# Altium PCB ide_podule-16bit_long.PcbDoc (part 2 of 2)
Units mm, origin at the board's own origin, x right, y up, seen from the top; angles counter-clockwise.
Board outline 101.85 x 160.01 mm, 2 copper layers (F.Cu, B.Cu), stack 1.571 mm thick; 35 components, 85 nets, 455 pads, 316 vias.
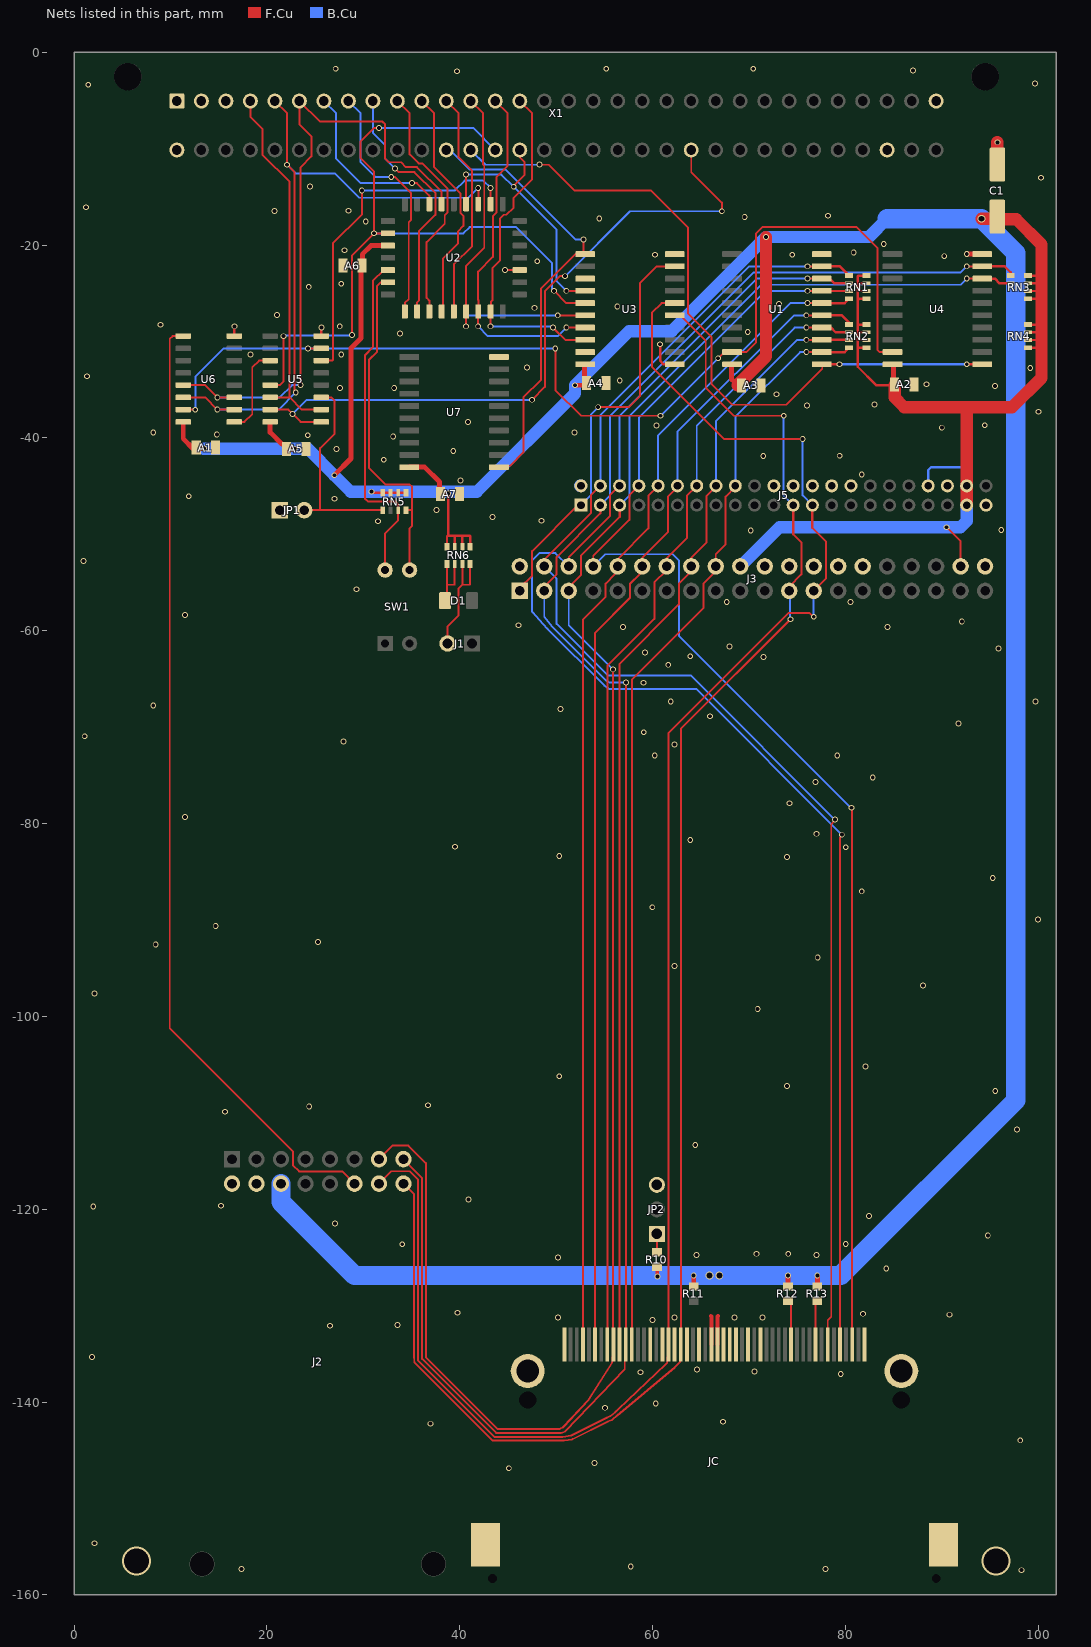
[diagram p2: the nets of this part, all layers, seen from the top]

## Via types
v1: diameter 0.6, hole 0.4, F.Cu to B.Cu, tented both sides, 311 vias
v2: diameter 0.8, hole 0.6, F.Cu to B.Cu, tented both sides, 3 vias
v3: diameter 3, hole 2.6, F.Cu to B.Cu, tented both sides, 2 vias

## Nets (pads, with @x,y where several pads share a name; then routed paths per layer and width w, separated by ;. In a path a pad name is that pad's centre, name@x,y a point inside that pad or via, vN(x,y) a via of type N, cw(c..) or ccw(c..) an arc to the next point about the centre after c; other vN are vias at no path point) (continued)
D6: J2.13 J3.5 J5.5 JC.5 RN3.2 U4.8 | length 200.5
  F.Cu w0.2: J2.13@31.623,-114.808 33.02,-113.411 34.671,-113.411 36.487,-115.227 36.487,-135.365 43.927,-142.805 50.344,-142.805 50.702,-142.622 50.705,-142.619 50.763,-142.561 53.331,-139.818 55.806,-135.903 55.841,-135.679 JC.5@55.941,-134.029 55.911,-133.999 55.911,-64.013 v1(55.906,-64.008) ; J3.5@51.308,-55.868 51.308,-55.487 52.578,-54.217 52.578,-52.185 56.578,-48.185 ; v1(92.583,-23.483) U4.8@94.235,-23.483
  F.Cu w0.254: 56.578,-48.185 J5.5@56.578,-46.978 ; U4.8@94.235,-23.483 95.504,-23.483 95.993,-23.972 RN3.2@97.144,-23.972
  B.Cu w0.2: J3.5@51.308,-55.868 51.308,-59.436 55.88,-64.008 v1(55.906,-64.008) ; J5.5@56.578,-46.978 56.642,-46.978 57.594,-46.026 57.594,-37.771 71.247,-24.118 91.948,-24.118 v1(92.583,-23.483)
D7: J2.15 J3.3 J5.3 JC.6 RN3.1 U4.9 | length 203.3
  F.Cu w0.2: J2.15@34.163,-114.808 34.163,-114.84 36.087,-116.764 36.087,-135.531 43.761,-143.205 50.51,-143.205 50.896,-143.076 50.956,-143.016 57.111,-136.584 57.111,-134.129 JC.6@57.211,-134.029 57.244,-133.996 57.244,-65.388 v1(57.246,-65.386) ; J3.3@48.768,-55.868 48.768,-55.424 50.038,-54.154 50.038,-52.376 54.578,-47.836 J5.3@54.578,-46.978 ; v1(92.583,-22.213) U4.9@94.235,-22.213
  F.Cu w0.254: U4.9@94.235,-22.213 96.52,-22.213 97.144,-22.837 RN3.1@97.144,-23.172
  B.Cu w0.2: J3.3@48.768,-55.868 48.768,-58.562 49.596,-59.571 55.195,-65.17 55.548,-65.362 55.592,-65.386 55.643,-65.386 v1(57.246,-65.386) ; J5.3@54.578,-46.978 54.61,-46.978 55.562,-46.026 55.562,-37.771 70.485,-22.848 91.948,-22.848 v1(92.583,-22.213)
D8: J3.4 J5.4 JC.47 RN1.1 U1.9 | length 149.2
  F.Cu w0.2: J3.4@48.768,-53.328 48.768,-52.63 53.594,-47.804 53.594,-45.962 J5.4@54.578,-44.978 ; v1(76.073,-22.213) U1.9@77.598,-22.213 ; JC.47@78.166,-134.029 78.166,-131.526 78.528,-131.164 78.528,-80.052 78.91,-79.67 v1(78.91,-79.586)
  F.Cu w0.254: U1.9@77.598,-22.213 79.421,-22.213 RN1.1@80.38,-23.172
  B.Cu w0.2: J3.4@48.768,-53.328 50.038,-54.598 50.038,-56.273 50.038,-59.295 55.405,-64.662 63.987,-64.662 v1(78.91,-79.586) ; J5.4@54.578,-44.978 54.578,-37.675 70.04,-22.213 v1(76.073,-22.213)
D9: J3.6 J5.6 JC.48 RN1.2 U1.8 | length 152.4
  F.Cu w0.2: J3.6@51.308,-53.328 51.308,-52.376 55.562,-48.121 55.562,-45.962 56.547,-44.978 J5.6@56.578,-44.978 ; v1(76.073,-23.483) U1.8@77.598,-23.483 ; JC.48@79.436,-134.029 79.436,-81.454 79.629,-81.261 v1(79.629,-81.153)
  F.Cu w0.254: U1.8@77.598,-23.483 78.359,-23.483 78.848,-23.972 RN1.2@80.38,-23.972
  B.Cu w0.2: J3.6@51.308,-53.328 49.923,-51.943 48.26,-51.943 47.498,-52.705 47.498,-58.032 47.563,-58.104 48.26,-58.877 49.088,-59.782 54.984,-65.678 55.277,-65.894 55.499,-66.04 64.516,-66.04 v1(79.629,-81.153) ; J5.6@56.578,-44.978 56.578,-37.708 70.802,-23.483 v1(76.073,-23.483)
D10: J3.8 J5.8 JC.49 RN1.3 U1.7 | length 143.1
  F.Cu w0.2: J3.8@53.848,-53.328 53.848,-52.249 57.594,-48.502 57.594,-45.962 J5.8@58.578,-44.978 ; v1(76.073,-24.753) U1.7@77.548,-24.753 80.361,-24.753 RN1.3@80.38,-24.772 ; v1(80.645,-78.359) 80.676,-78.39 80.676,-133.999 JC.49@80.706,-134.029
  B.Cu w0.2: J3.8@53.848,-53.328 55.106,-52.07 62.103,-52.07 62.738,-52.705 62.738,-60.539 80.558,-78.359 v1(80.645,-78.359) ; J5.8@58.578,-44.978 58.578,-37.93 71.755,-24.753 v1(76.073,-24.753)
D11: J3.10 J5.10 JC.27 RN1.4 U1.6 | length 123.2
  F.Cu w0.2: JC.27@52.766,-134.029 52.766,-58.848 55.118,-56.496 55.118,-55.118 56.101,-54.135 56.101,-53.615 J3.10@56.388,-53.328 56.388,-52.566 59.563,-49.391 59.563,-46.026 60.578,-45.011 J5.10@60.578,-44.978 ; v1(76.073,-26.023) U1.6@77.598,-26.023
  F.Cu w0.254: U1.6@77.598,-26.023 79.929,-26.023 RN1.4@80.38,-25.572
  B.Cu w0.2: J5.10@60.578,-44.978 60.578,-39.74 74.295,-26.023 v1(76.073,-26.023)
D12: J3.12 J5.12 JC.28 RN2.1 U1.5 | length 121.5
  F.Cu w0.2: JC.28@54.036,-134.029 54.036,-60.228 57.658,-56.606 57.658,-55.118 58.651,-54.125 58.651,-53.605 J3.12@58.928,-53.328 58.928,-52.439 61.595,-49.772 61.595,-46.089 62.578,-45.106 J5.12@62.578,-44.978 ; v1(75.946,-27.293) U1.5@77.598,-27.293
  F.Cu w0.254: U1.5@77.598,-27.293 79.629,-27.293 80.38,-28.044 RN2.1@80.38,-28.252
  B.Cu w0.2: J5.12@62.578,-44.978 62.578,-39.391 74.676,-27.293 v1(75.946,-27.293)
D13: J3.14 J5.14 JC.29 RN2.2 U1.4 | length 119.4
  F.Cu w0.2: JC.29@55.306,-134.029 55.306,-63.657 60.198,-58.765 60.198,-54.991 61.468,-53.721 61.468,-52.503 63.563,-50.407 63.563,-46.026 64.578,-45.011 J5.14@64.578,-44.978 ; v1(75.946,-28.563) U1.4@77.598,-28.563
  F.Cu w0.254: U1.4@77.598,-28.563 78.486,-28.563 78.975,-29.052 RN2.2@80.38,-29.052
  B.Cu w0.2: J5.14@64.578,-44.978 64.578,-38.725 74.739,-28.563 v1(75.946,-28.563)
D14: J3.16 J5.16 JC.30 RN2.3 U1.3 | length 117.2
  F.Cu w0.2: JC.30@56.576,-134.029 56.576,-63.439 62.738,-57.277 62.738,-55.118 63.721,-54.135 63.721,-53.615 J3.16@64.008,-53.328 64.008,-52.439 65.596,-50.852 65.596,-46.026 66.578,-45.043 J5.16@66.578,-44.978 ; v1(75.946,-29.833) U1.3@77.598,-29.833
  F.Cu w0.254: U1.3@77.598,-29.833 80.361,-29.833 RN2.3@80.38,-29.852
  B.Cu w0.2: J5.16@66.578,-44.978 66.578,-38.249 74.993,-29.833 v1(75.946,-29.833)
D15: J3.18 J5.18 JC.31 RN2.4 U1.2 | length 115.4
  F.Cu w0.2: JC.31@57.846,-134.029 57.846,-65.09 65.278,-57.658 65.278,-55.118 66.261,-54.135 66.261,-53.615 J3.18@66.548,-53.328 66.548,-52.058 67.564,-51.042 67.564,-46.089 68.578,-45.075 J5.18@68.578,-44.978 ; v1(75.946,-31.103) U1.2@77.598,-31.103
  F.Cu w0.254: U1.2@77.598,-31.103 79.929,-31.103 RN2.4@80.38,-30.652
  B.Cu w0.2: J5.18@68.578,-44.978 68.578,-37.836 75.311,-31.103 v1(75.946,-31.103)
DMACK: JC.44 R12.1 | length 4.5
  F.Cu w0.2: R12.1@74.295,-129.528 74.356,-129.589 JC.44@74.356,-134.029
F_CE: U2.22 U5.6 | length 35.8
  F.Cu w0.2: U5.6@25.637,-31.992 26.785,-31.992 26.851,-31.926 26.851,-19.834 29.845,-16.84 v1(29.845,-14.339) ; U2.22@43.201,-15.762 v1(43.201,-14.085)
  B.Cu w0.2: v1(29.845,-14.339) 39.497,-14.339 40.513,-13.323 42.439,-13.323 v1(43.201,-14.085)
F_Enable: JP1.2 RN5.5 U5.3 | length 21.6
  F.Cu w0.2: JP1.2@23.876,-47.5 25.527,-47.5 ; U5.3@25.637,-35.802 26.658,-35.802 27.014,-36.158 27.014,-39.585 25.527,-41.073 25.527,-47.5 ; RN5.5@32.009,-47.5 25.527,-47.5
GND: A1.2 A2.2 A3.2 A4.2 A5.2 A6.2 A7.2 C1.2 J2.2 J2.4 J3.2 J3.22 J3.24 J3.26 J3.28 J3.30 J3.40 J5.2 J5.22 J5.24 J5.26 J5.28 J5.30 J5.40 J5.43 JC.1 JC.8 JC.9 JC.10 JC.11 JC.12 JC.14 JC.15 JC.16 JC.17 JC.39 JC.50 JC.MH1 JC.MH2 JC.MP1 JC.MP2 JP1.1 JP2.3 U1.10 U2.16 U3.1 U3.10 U3.13 U3.19 U4.10 U5.8 U6.8 U7.10 X1.a1 X1.c1 | length 11.4
  F.Cu w0.2: J3.28@79.248,-53.328 J3.28@79.566,-53.011
  F.Cu w0.254: U6.8@16.62,-29.452 16.62,-28.453 v1(16.637,-28.436) ; U5.8@25.637,-29.452 25.637,-28.58 v1(25.654,-28.563) ; v1(44.704,-22.594) U2.16@46.228,-22.594 ; v1(60.774,-30.293) 60.774,-31.997 61.151,-32.373 U3.1@62.358,-32.373
  F.Cu w0.508: A7.2@40.064,-45.848 A7.2@40.081,-45.865 ; v1@40.064,-44.442 v1(40.081,-44.425) ; v1(92.583,-20.943) U4.10@94.235,-20.943
  F.Cu w1.27: C1.2@95.758,-11.651 v1(95.758,-9.351)
  B.Cu w1.27: J5.2@52.483,-44.978 J5.2@52.578,-44.978
  other v1: 98.253,-157.433 17.354,-157.306 77.933,-157.306 57.74,-157.052 2.114,-154.639 45.092,-146.871 53.964,-146.32 98.126,-143.971 36.957,-142.24 67.317,-142.045 55.066,-140.599 60.332,-140.14 79.509,-137.092 58.753,-136.911 70.577,-136.827 64.601,-136.615 1.86,-135.335 26.543,-132.08 33.535,-132.012 59.988,-131.492 50.196,-131.232 62.261,-131.232 68.484,-131.232 71.405,-131.232 90.805,-130.937 81.819,-130.851 39.758,-130.742 84.232,-126.152 50.196,-125.009 64.547,-124.755 76.993,-124.755 70.77,-124.628 74.072,-124.628 34.043,-123.63 80.041,-123.612 94.772,-122.718 27.058,-121.471 82.454,-120.691 1.987,-119.714 15.24,-119.634 40.894,-118.999 64.42,-113.325 97.804,-111.734 15.652,-109.896 24.384,-109.347 36.703,-109.22 95.535,-107.737 73.945,-107.229 50.323,-106.213 82.072,-105.192 70.897,-99.228 2.114,-97.616 88.041,-96.81 62.261,-94.783 77.12,-93.894 8.464,-92.536 25.308,-92.294 14.687,-90.631 99.98,-89.957 59.975,-88.687 81.691,-87.031 95.281,-85.639 73.945,-83.48 50.323,-83.353 80.041,-82.464 39.506,-82.407 63.912,-81.702 76.993,-81.067 11.512,-79.328 74.199,-77.892 76.906,-75.688 82.834,-75.22 60.229,-72.939 79.152,-72.939 62.261,-71.796 27.949,-71.485 1.098,-70.946 59.086,-70.526 91.724,-69.632 65.944,-68.875 50.45,-68.113 8.21,-67.771 61.88,-67.351 99.726,-67.351 59.055,-65.405 61.626,-63.541 71.501,-62.738 63.912,-62.652 59.213,-62.271 95.885,-61.849 67.976,-61.636 56.927,-59.604 84.359,-59.604 46.101,-59.436 92.075,-59.055 11.512,-58.373 67.691,-57.023 80.518,-57.023 29.292,-55.706 0.971,-52.785 70.186,-49.61 96.163,-49.571 31.53,-48.656 48.469,-48.594 43.389,-48.213 37.581,-47.472 27.006,-46.308 11.893,-46.054 81.695,-43.804 32.12,-42.277 71.484,-41.874 79.401,-41.855 39.325,-41.355 27.232,-41.161 33.096,-39.853 24.232,-39.726 14.808,-39.649 8.21,-39.45 51.898,-39.45 89.998,-38.942 60.401,-38.71 94.443,-38.688 40.869,-38.354 100.031,-37.291 76.028,-36.656 83.013,-36.529 72.847,-35.484 27.584,-34.823 33.198,-34.823 95.511,-34.608 88.417,-34.442 56.591,-34.061 1.352,-33.608 99.163,-32.766 46.99,-32.69 18.288,-31.369 27.711,-31.369 33.791,-29.174 69.875,-29.032 27.559,-28.436 8.972,-28.274 21.037,-27.258 47.752,-26.518 56.343,-26.369 73.101,-26.111 24.339,-24.337 27.715,-24.016 48.04,-21.681 90.251,-21.155 60.249,-21.006 74.486,-21.007 80.854,-20.781 28.042,-20.549 83.981,-19.903 30.255,-17.565 54.473,-17.253 69.551,-17.098 78.187,-16.971 20.783,-16.463 28.452,-16.447 1.225,-16.082 24.46,-13.945 100.284,-13.027 1.479,-3.382 99.65,-3.255 39.705,-1.978 86.995,-1.905 27.132,-1.724 55.199,-1.724 70.439,-1.724
  other v3: 6.477,-156.464 95.631,-156.464
LA2: U2.12 U3.18 X1.a15 | length 36.3
  F.Cu w0.2: v1(43.18,-28.436) 43.18,-26.907 U2.12@43.201,-26.887 43.231,-26.856 43.231,-25.896 43.383,-25.744 43.383,-22.391 44.181,-21.593 44.181,-17.245 44.562,-16.864 44.846,-16.864 45.593,-16.117 45.593,-15.101 47.498,-13.196 47.498,-6.338 X1.a15@46.228,-5.068 ; v1(49.672,-28.563) 50.942,-29.833 U3.18@53.008,-29.833
  B.Cu w0.2: v1(43.18,-28.436) 49.545,-28.436 v1(49.672,-28.563)
LA3: U2.11 U3.17 X1.a14 | length 37.1
  F.Cu w0.2: v1(41.91,-28.436) 41.91,-26.907 U2.11@41.931,-26.887 41.961,-26.856 41.961,-25.744 41.91,-25.693 41.91,-22.751 43.434,-21.227 43.434,-17.006 43.815,-16.625 43.815,-12.942 44.958,-11.799 44.958,-6.338 X1.a14@43.688,-5.068 ; v1(51.054,-28.563) U3.17@53.008,-28.563
  B.Cu w0.2: v1(41.91,-28.436) 42.926,-29.452 50.165,-29.452 v1(51.054,-28.563)
LA4: U2.10 U3.16 X1.a13 | length 38.1
  F.Cu w0.2: v1(40.64,-28.436) 40.64,-26.907 U2.10@40.661,-26.887 40.661,-22.162 42.545,-20.278 42.545,-11.799 42.418,-11.672 42.418,-6.338 X1.a13@41.148,-5.068 ; v1(50.165,-27.293) U3.16@53.008,-27.293
  B.Cu w0.2: v1(40.64,-28.436) 40.64,-27.547 40.894,-27.293 v1(50.165,-27.293)
LA5: U2.9 X1.a12 | length 23.7
  F.Cu w0.2: X1.a12@38.608,-5.068 39.878,-6.338 39.878,-10.91 41.275,-12.307 41.275,-20.112 39.391,-21.996 U2.9@39.391,-26.887
LA6: U2.8 X1.a11 | length 24.5
  F.Cu w0.2: X1.a11@36.068,-5.068 37.338,-6.338 37.338,-11.926 40.06,-14.649 40.06,-16.64 40.386,-16.965 40.386,-18.022 39.808,-18.6 39.808,-19.87 38.261,-21.417 38.261,-26.746 U2.8@38.121,-26.887
LA7: U2.7 X1.a10 | length 25.2
  F.Cu w0.2: X1.a10@33.528,-5.068 34.798,-6.338 34.798,-10.598 35.745,-11.545 36.107,-11.545 38.735,-14.173 38.735,-16.621 38.443,-16.913 38.443,-17.806 36.561,-19.688 36.561,-25.48 36.851,-25.769 U2.7@36.851,-26.887
LA8: U2.6 X1.a9 | length 26.2
  F.Cu w0.2: v1(33.274,-12.053) 33.655,-12.434 35.294,-12.434 37.465,-14.605 37.465,-16.879 35.761,-18.583 35.761,-24.253 35.757,-24.258 35.757,-25.757 35.581,-25.933 U2.6@35.581,-26.887
  B.Cu w0.2: X1.a9@30.988,-5.068 30.988,-8.37 32.258,-9.64 32.258,-11.037 v1(33.274,-12.053)
LA9: U2.5 X1.a8 | length 25.9
  F.Cu w0.2: v1(32.893,-12.942) 33.274,-12.942 34.925,-14.593 34.925,-17.425 34.709,-17.641 34.709,-25.604 34.311,-26.003 U2.5@34.311,-26.887
  B.Cu w0.2: X1.a8@28.448,-5.068 29.718,-6.338 29.718,-11.418 31.242,-12.942 v1(32.893,-12.942)
LA10: U2.27 X1.a7 | length 18.6
  F.Cu w0.2: v1(35.052,-13.577) 35.56,-13.577 36.851,-14.868 U2.27@36.851,-15.762
  B.Cu w0.2: X1.a7@25.908,-5.068 27.178,-6.338 27.178,-11.037 29.718,-13.577 v1(35.052,-13.577)
LA11: U2.26 U6.3 U6.13 X1.a6 | length 67.5
  F.Cu w0.2: U6.13@11.32,-34.532 13.589,-34.532 v1(14.859,-35.802) U6.3@16.62,-35.802 ; v1(23.495,-34.532) 23.495,-11.938 24.625,-10.808 24.625,-8.733 23.368,-7.476 X1.a6@23.368,-5.068 25.512,-7.212 31.989,-7.212 32.258,-7.481 32.258,-11.037 32.639,-11.418 33.909,-11.418 34.417,-11.926 35.56,-11.926 38.121,-14.487 U2.26@38.121,-15.762
  B.Cu w0.2: v1(14.859,-35.802) 21.336,-35.802 22.606,-34.532 v1(23.495,-34.532)
LA12: U2.23 U6.2 U6.14 X1.a5 | length 69.1
  F.Cu w0.2: U6.14@11.32,-35.802 13.589,-35.802 v1(14.859,-37.072) U6.2@16.62,-37.072 ; X1.a5@20.828,-5.068 22.098,-6.338 v1(22.098,-11.672) 22.845,-12.419 22.845,-35.152 v1(22.987,-35.294) ; v1(41.91,-14.085) 41.931,-14.106 U2.23@41.931,-15.762
  B.Cu w0.2: v1(14.859,-37.072) 21.209,-37.072 v1(22.987,-35.294) ; v1(22.098,-11.672) 22.987,-12.561 27.051,-12.561 29.591,-15.101 40.894,-15.101 v1(41.91,-14.085)
LA13: U5.2 U5.14 X1.a4 | length 38.2
  F.Cu w0.2: X1.a4@18.288,-5.068 18.288,-6.719 19.558,-7.989 19.558,-10.668 22.352,-13.462 22.352,-35.802 ; U5.14@20.337,-35.802 21.971,-35.802 22.352,-35.802 ; U5.2@25.637,-37.072 23.622,-37.072 22.352,-35.802
LA14: X1.a3
LA15: X1.a2
NetD1_2: D1.2 RN6.5 RN6.6 | length 6.8
  F.Cu w0.2: D1.2@38.481,-56.884 38.678,-56.687 38.678,-55.233 ; RN6.5@38.678,-53.085 38.678,-55.233 ; RN6.6@39.478,-53.085 39.478,-55.214 39.459,-55.233 38.678,-55.233
NetJ1_2: J1.2 RN6.7 RN6.8 | length 11.9
  F.Cu w0.2: J1.2@38.735,-61.329 38.735,-59.551 39.878,-58.408 39.878,-55.614 40.278,-55.214 ; RN6.7@40.278,-53.085 40.278,-55.214 ; RN6.8@41.078,-53.085 41.078,-55.233 40.259,-55.233 40.278,-55.214
NetJ7_1: RN5.7 SW1.4 U2.2 | length 36
  F.Cu w0.2: SW1.4@32.258,-53.709 32.258,-49.899 33.617,-48.54 RN5.7@33.617,-47.508 33.617,-46.908 33.306,-46.597 30.48,-46.597 30.175,-46.292 30.175,-31.408 31.003,-30.58 31.003,-23.722 32.131,-22.594 U2.2@32.553,-22.594
NetJ7_3: RN5.8 SW1.3 U2.3 | length 35.2
  F.Cu w0.2: U2.3@32.553,-23.864 31.816,-23.864 31.403,-24.277 31.403,-31.103 30.581,-31.925 30.581,-38.973 30.581,-39.369 30.575,-39.375 30.575,-39.69 30.581,-39.696 30.581,-43.103 32.297,-44.819 34.778,-44.819 35.052,-45.093 35.052,-47.486 ; RN5.8@34.417,-47.508 34.439,-47.486 35.052,-47.486 ; SW1.3@34.798,-53.709 34.798,-49.391 35.052,-49.137 35.052,-47.486
NetJP2_1: JP2.1 R10.1 | length 1.9
  F.Cu w0.2: R10.1@60.452,-124.472 JP2.1@60.452,-122.555
NetU5_11: U5.11 U6.1 | length 9.2
  F.Cu w0.2: U6.1@16.62,-38.342 17.665,-38.342 18.479,-37.529 18.479,-32.703 19.189,-31.992 U5.11@20.337,-31.992
nPDIAG: JC.46 R13.1 | length 4.5
  F.Cu w0.2: R13.1@76.88,-129.528 R13.1@76.941,-129.589 ; JC.46@76.896,-134.029 R13.1@76.896,-129.589
PR/{\W\}\: U1.1 U4.1 X1.c13 | length 74.1
  F.Cu w0.2: v1(48.26,-11.647) 48.285,-11.672 49.224,-11.672 51.891,-14.339 59.817,-14.339 63.691,-18.213 63.691,-25.706 63.693,-25.708 63.693,-27.105 66.103,-29.516 66.103,-34.405 68.263,-36.564 73.85,-36.564 77.598,-32.817 U1.1@77.598,-32.373
  F.Cu w0.254: U1.1@77.598,-32.373 v1(79.375,-32.373) ; v1(92.583,-32.373) U4.1@94.235,-32.373
  B.Cu w0.2: X1.c13@41.148,-10.148 42.672,-11.672 48.235,-11.672 v1(48.26,-11.647)
  B.Cu w0.254: v1(79.375,-32.373) v1(92.583,-32.373)
U2K: U1.19 U4.19 U5.7 U6.15 | length 111.2
  F.Cu w0.2: U6.15@11.32,-37.072 11.326,-37.078 12.567,-37.078 v1(12.573,-37.084) ; v1(24.272,-30.722) U5.7@25.637,-30.722 ; v1(49.911,-30.722) 49.911,-35.04 52.578,-37.707 v1(60.833,-37.707) ; v1(66.802,-31.738) 67.437,-31.103 U1.19@68.248,-31.103 69.735,-31.103 70.739,-30.099 70.739,-18.784 71.374,-18.149 81.153,-18.149 83.312,-20.308 83.312,-30.849 83.566,-31.103 U4.19@84.835,-31.103
  B.Cu w0.2: v1(12.573,-37.084) 12.573,-33.659 15.51,-30.722 v1(24.272,-30.722) v1(49.911,-30.722) ; v1(60.833,-37.707) v1(66.802,-31.738)
VCC: A1.1 A2.1 A3.1 A4.1 A5.1 A6.1 A7.1 C1.1 J2.6 J3.20 J3.38 J5.38 J5.41 J5.42 JC.13 JC.38 R10.2 R11.2 R12.2 R13.2 RN1.5 RN1.6 RN1.7 RN1.8 RN2.5 RN2.6 RN2.7 RN2.8 RN3.5 RN3.6 RN3.7 RN3.8 RN4.5 RN4.6 RN4.7 RN4.8 RN5.1 RN5.2 RN5.3 RN5.4 RN6.1 RN6.2 RN6.3 RN6.4 U1.20 U2.32 U3.20 U4.20 U5.16 U6.16 U7.20 X1.a32 X1.c30 | length 490.9
  F.Cu w0.2: v1(90.487,-49.264) 91.948,-50.725 J3.38@91.948,-53.328
  F.Cu w0.254: v1(30.861,-45.581) 30.988,-45.708 RN5.4@32.017,-45.708 RN5.3@32.817,-45.708 RN5.2@33.617,-45.708 RN5.1@34.417,-45.708 ; RN6.4@38.678,-51.285 38.678,-50.21 38.735,-50.153 39.497,-50.153 ; v1@38.678,-45.788 v1@38.745,-45.855 ; 38.811,-50.153 v1(38.811,-45.771) ; RN6.3@39.478,-51.285 39.478,-50.172 39.497,-50.153 ; RN6.2@40.278,-51.285 40.278,-50.172 40.259,-50.153 ; RN6.1@41.078,-51.285 41.078,-50.21 41.021,-50.153 40.259,-50.153 ; A4.1@53.21,-34.37 A4.1@53.372,-34.532 ; 81.407,-25.642 81.35,-25.642 ; RN2.5@82.18,-30.652 81.28,-30.652 ; RN2.6@82.18,-29.852 81.28,-29.852 ; RN2.7@82.18,-29.052 81.28,-29.052 ; RN2.8@82.18,-28.252 81.28,-28.252 ; RN1.5@82.18,-25.572 81.28,-25.572 ; RN1.6@82.18,-24.772 81.28,-24.772 ; RN1.7@82.18,-23.972 81.28,-23.972 ; RN1.8@82.18,-23.172 81.337,-23.172 81.28,-23.229 81.28,-23.972 ; A2.1@84.993,-34.532 83.185,-34.532 81.28,-32.627 81.28,-30.652 ; RN4.5@98.944,-30.652 100.33,-30.652 ; RN4.6@98.944,-29.852 100.33,-29.852 100.476,-29.852 ; RN4.7@98.944,-29.052 100.33,-29.052 100.584,-29.052 ; RN4.8@98.944,-28.252 100.33,-28.252 ; RN3.5@98.944,-25.572 100.33,-25.572 100.584,-25.572 ; RN3.6@98.944,-24.772 100.33,-24.772 100.457,-24.772 ; RN3.7@98.944,-23.972 100.33,-23.972 100.584,-23.972 100.476,-23.864 ; RN3.8@98.944,-23.172 100.33,-23.172 ; 39.497,-50.153 40.259,-50.153 ; 81.28,-30.652 81.28,-29.852 ; 81.28,-29.852 81.28,-29.052 ; 81.28,-29.052 81.28,-28.252 ; 81.28,-28.252 81.28,-25.642 ; 81.28,-25.642 81.35,-25.642 ; 81.28,-25.642 81.28,-25.572 ; 81.28,-25.572 81.35,-25.642 ; 81.28,-25.572 81.28,-24.772 ; 81.28,-24.772 81.28,-23.972
  F.Cu w0.4: R10.2@60.452,-125.972 60.482,-126.002 60.482,-126.939 v1(60.513,-126.969) ; 66.04,-131.064 66.101,-131.125 JC.13@66.101,-134.029 ; JC.38@66.736,-134.029 66.736,-131.13 66.802,-131.064
  F.Cu w0.5: R11.2@64.262,-128.028 v1(64.262,-126.873) ; R12.2@74.041,-128.028 v1(74.041,-126.873) ; R13.2@77.089,-128.028 v1(77.089,-126.873)
  F.Cu w0.508: U6.16@11.32,-38.342 11.32,-40.087 12.333,-41.1 v1(13.462,-41.1) ; U5.16@20.337,-38.342 20.337,-39.435 21.562,-40.66 21.817,-40.66 22.038,-40.881 22.038,-41.136 v1(22.86,-41.136) ; v1(26.994,-43.873) 28.722,-42.145 28.722,-30.702 29.756,-29.668 29.756,-22.273 A6.1@29.88,-22.149 ; A6.1@29.908,-22.149 29.908,-20.959 30.813,-20.054 U2.32@32.553,-20.054 ; U7.20@34.769,-43.041 36.375,-43.041 37.896,-44.562 37.896,-45.742 37.943,-45.788 38.794,-45.788 v1(38.811,-45.771) ; v1(51.943,-34.544) 53.147,-34.544 53.21,-34.481 53.21,-34.37 A4.1@53.372,-34.532 ; U3.20@52.958,-32.373 52.958,-33.934 A4.1@53.21,-34.186 ; U1.20@68.198,-32.373 68.198,-33.934 A3.1@68.796,-34.532 ; U4.20@84.885,-32.373 84.947,-32.373 84.993,-32.419 A2.1@84.993,-34.525
  F.Cu w0.762: J5.42@92.578,-44.941 J5.42@92.583,-44.946
  F.Cu w1.27: A3.1@68.796,-34.532 71.755,-31.573 v1(71.755,-19.165) ; A2.1@85.106,-34.532 85.106,-35.818 86.106,-36.818 92.578,-36.818 ; J5.41@92.578,-46.978 J5.42@92.578,-44.978 ; J5.42@92.578,-44.941 92.578,-36.94 ; 92.578,-36.83 97.282,-36.83 100.33,-33.782 100.33,-30.652 100.33,-29.852 100.33,-29.052 100.33,-28.252 100.33,-25.572 100.33,-24.772 100.33,-23.972 100.33,-23.172 100.33,-19.939 97.719,-17.328 95.781,-17.328 95.725,-17.272 v2(94.107,-17.272)
  B.Cu w0.254: J5.38@88.578,-44.978 88.578,-43.363 88.9,-43.041 92.329,-43.041 92.578,-43.29 J5.42@92.578,-44.978
  B.Cu w1.27: v1@13.462,-41.136 v1(22.86,-41.136) 24.257,-41.136 v1(26.994,-43.873) 28.702,-45.581 v1(30.861,-45.581) 41.763,-45.581 51.943,-35.401 v1(51.943,-34.544) 57.543,-28.944 61.976,-28.944 v1(71.755,-19.165) 82.435,-19.165 84.328,-17.272 ; J3.20@69.088,-53.328 73.152,-49.264 v1(90.487,-49.264) 91.948,-49.264 92.578,-48.634 J5.41@92.578,-46.978
  B.Cu w2: J2.6@21.463,-117.348 21.463,-119.253 29.083,-126.873 v1(64.262,-126.873) v2(65.913,-126.873) v2(66.929,-126.873) v1(74.041,-126.873) v1(77.089,-126.873) 79.502,-126.873 97.663,-108.712 97.663,-20.828 v2(94.107,-17.272) 84.328,-17.272
{\B\I\O\R\D\}\: J2.14 J3.25 J5.25 JC.34 U3.6 | length 188.3
  F.Cu w0.2: J2.14@31.623,-117.348 32.912,-116.059 34.817,-116.059 35.687,-116.93 35.687,-135.696 43.596,-143.605 50.675,-143.605 51.56,-143.457 55.193,-141.647 55.305,-141.58 55.636,-141.451 56.176,-140.986 56.352,-140.83 56.433,-140.757 61.345,-136.079 61.521,-135.903 61.556,-135.679 JC.34@61.656,-134.029 61.656,-70.609 74.118,-58.147 76.259,-58.147 76.659,-58.547 v1(76.708,-58.547) ; U3.6@62.308,-26.023 60.93,-26.023 59.929,-27.024 59.929,-32.602 67.447,-40.12 v1(75.565,-40.12) ; 76.578,-49.325 77.978,-50.725 77.978,-54.598 J3.25@76.708,-55.868
  F.Cu w0.254: 76.578,-49.325 J5.25@76.578,-46.978
  B.Cu w0.2: v1(75.565,-40.12) 75.565,-45.965 J5.25@76.578,-46.978 ; v1(76.708,-58.547) J3.25@76.708,-55.868
{\B\I\O\W\R\}\: J2.16 J3.23 J5.23 JC.35 U3.5 | length 175.2
  F.Cu w0.2: J2.16@34.163,-117.348 35.269,-118.454 35.269,-135.245 35.285,-135.783 35.287,-135.862 43.43,-144.005 50.841,-144.005 51.66,-143.867 51.712,-143.85 55.39,-142.012 55.447,-141.987 55.801,-141.851 56.333,-141.389 62.28,-136.414 62.826,-135.868 62.826,-134.129 JC.35@62.926,-134.029 62.926,-70.187 v1(74.304,-58.81) ; U3.5@62.358,-27.293 62.865,-27.293 65.517,-29.945 65.517,-34.781 68.443,-37.707 v1(73.596,-37.707) ; J3.23@74.168,-55.868 74.168,-55.424 75.438,-54.154 75.438,-50.852 74.578,-49.992
  F.Cu w0.254: 74.578,-49.992 J5.23@74.578,-46.978
  B.Cu w0.2: v1(73.596,-37.707) 73.596,-45.997 J5.23@74.578,-46.978 ; J3.23@74.168,-55.868 74.231,-55.932 74.231,-58.738 v1(74.304,-58.81)
{\I\O\R\D\}\: U2.24 U3.14 X1.c15 | length 28.1
  F.Cu w0.2: v1(40.64,-12.688) 40.661,-12.709 U2.24@40.661,-15.762 ; v1(45.593,-13.958) 45.593,-13.831 46.736,-12.688 46.736,-11.418 46.228,-10.91 X1.c15@46.228,-10.148 ; v1(51.054,-24.753) U3.14@53.008,-24.753
  B.Cu w0.2: v1(40.64,-12.688) 44.323,-12.688 v1(45.593,-13.958) 50.038,-18.403 50.038,-23.737 v1(51.054,-24.753)
{\I\O\W\R\}\: U2.31 U3.15 U5.13 X1.c14 | length 79.6
  F.Cu w0.2: U5.13@20.337,-34.532 21.348,-34.532 21.717,-34.163 v1(21.717,-29.452) ; v1(28.829,-29.337) 28.829,-21.07 v1(31.115,-18.784) ; v1(31.638,-7.862) 31.115,-7.862 29.718,-9.259 29.718,-10.998 31.115,-12.395 v1(31.115,-18.784) ; U2.31@33.206,-18.784 U2.31@32.553,-18.784 v1(31.115,-18.784) ; v1(49.784,-24.753) 51.054,-26.023 U3.15@53.008,-26.023
  B.Cu w0.2: v1(21.717,-29.452) 21.775,-29.395 28.771,-29.395 v1(28.829,-29.337) ; v1(31.115,-18.784) 40.386,-18.784 41.021,-18.149 45.847,-18.149 49.582,-21.884 49.582,-24.551 v1(49.784,-24.753) ; v1(31.638,-7.862) 41.402,-7.862 X1.c14@43.688,-10.148
{\P\S\}\: U5.1 U5.15 X1.c22 | length 72.5
  F.Cu w0.2: U5.15@20.337,-37.072 22.225,-37.072 v1(22.669,-37.517) 23.495,-38.342 U5.1@25.637,-38.342 ; v1(47.498,-36.056) 48.83,-34.724 48.83,-24.788 50.389,-23.229 v1(50.927,-23.229) ; X1.c22@64.008,-10.148 64.008,-12.434 67.183,-15.609 v1(67.183,-16.498)
  B.Cu w0.2: v1(22.669,-37.517) 24.13,-36.056 v1(47.498,-36.056) ; v1(50.927,-23.229) 57.658,-16.498 v1(67.183,-16.498)
{\R\S\T\-\B\}\: J3.1 J5.1 U3.9 | length 43.2
  F.Cu w0.2: J3.1@46.228,-55.551 47.498,-54.281 47.498,-51.741 J5.1@52.261,-46.978 ; v1(54.356,-36.818) 57.531,-36.818 58.674,-35.675 58.674,-23.991 60.452,-22.213 U3.9@62.358,-22.213
  F.Cu w0.254: J5.1@52.261,-46.978 J5.1@52.578,-46.978
  B.Cu w0.2: J5.1@52.578,-46.978 53.594,-45.962 53.594,-37.58 v1(54.356,-36.818)
{\R\S\T\}\: U3.11 U7.1 X1.c12 | length 46.7
  F.Cu w0.2: U7.1@44.069,-43.041 44.217,-42.893 45.227,-42.893 46.609,-41.511 46.609,-35.802 48.43,-33.981 48.43,-24.496 51.983,-20.943 U3.11@53.008,-20.943 52.832,-20.767 v1(52.832,-19.419)
  B.Cu w0.2: X1.c12@38.608,-10.148 39.019,-10.148 41.051,-12.18 44.762,-12.18 52.001,-19.419 v1(52.832,-19.419)
{\U\S\B\_\C\S\}\: J2.12 U6.9 | length 99.7
  F.Cu w0.2: U6.9@11.32,-29.452 10.22,-29.452 9.927,-29.746 9.927,-101.24 22.692,-114.005 22.692,-115.425 23.34,-116.072 27.807,-116.072 J2.12@29.083,-117.348
pads on no net: J2.8 J2.M J3.19 J3.21 J3.27 J3.29 J3.31 J3.32 J3.34 J5.19 J5.20 J5.21 J5.27 J5.29 J5.31 J5.32 J5.34 J5.44 JC.24 JC.25 JC.26 JC.33 JC.37 JC.40 JC.41 JC.42 JC.43 JC.MH3 JC.MH4 JC.MH5 JC.MH6 RN5.6 U3.7 U5.4 U5.5 U5.9 U5.10 U5.12 U6.5 U6.6 U6.7 U6.10 U6.12 X1.c2 X1.c3 X1.c4 X1.c5 X1.c6 X1.c7 X1.c8 X1.c9 X1.c10 X1.c11 X1.c16 X1.c17 X1.c18 X1.c19 X1.c20 X1.c21 X1.c23 X1.c24 X1.c25 X1.c26 X1.c27 X1.c28 X1.c29 X1.c31 X1.c32 X1.Un1 X1.Un2

## Polygon pours and split planes (outlines as drawn)
GND on F.Cu "NONET_L-01_P-001" (solid, remove dead copper, pour order 3): 0.254,0 101.854,0 101.854,-160.1 101.454,-159.7 0,-159.7
GND on F.Cu "F.Cu-GND-1" (solid, remove dead copper, pour order 1): 95.123,-10.783 91.313,-10.783 91.313,-4.433 95.123,-4.433
GND on F.Cu "F.Cu-GND" (solid, remove dead copper, pour order 0): 95.123,-18.403 91.313,-18.403 91.313,-10.148 95.123,-10.148
VCC on B.Cu "NONET_L-01_P-001" (solid, remove dead copper, pour order 2): 88.138,-4.191 88.138,-5.334 84.582,-8.89 83.439,-8.89 83.439,-17.526 83.566,-17.653 83.693,-17.526 95.123,-17.526 95.123,-4.191
GND on B.Cu "B.Cu-GND" (solid, remove dead copper, pour order 4): 101.854,-160 0,-160 0,0.012 101.854,0.012

## Keep-outs
Edge.Cuts:
  lines w0: 0,-160.034 0,0.012 101.854,0.012 101.854,-160.034
  lines w0.254: 0,-160.034 0,0.012 101.854,0.012 101.854,-160.034 0,-160.034

## Other copper
F.Cu:
  region net VCC: 65.532,-126.238 65.532,-131.826 67.31,-131.826 67.31,-126.238

## Silkscreen, mask and mechanical layers (free items; w line width, h text height)
F.SilkS:
  lines w0.254: 45.72,-58.408 46.228,-57.646 46.736,-58.408 45.72,-58.408
  text "Acorn IDE / Podule / V5-16d-IJ1" at 7.366,-21.082 h3
  text "© 2026 I Stocks" at 7.62,-24.13 h2
  text "Full-length podule layout + CF by IanJ" at 6.477,-26.162 h1
  text "^Pin 1" at 53.925,-50.006 h1.5
  text "Disable / Flash" at 21.336,-51.1 h1
  text "Slave" at 62.611,-117.983 h1.52
  text "Master" at 62.611,-123.317 h1.52
Dwgs.User:
  lines w0.254: 0,-70.346 0,-68.314 ; 0,-65.52 0,-63.234 ; 101.854,-71.362 101.854,-68.314 ; 101.854,-66.536 101.854,-63.234

## Text inside footprints (layer, text, board x,y; h text height)
X1: Cmts.User "Board edge" at 48.462,1.943 h0.7